# Altium PCB Oct_Ribbon_V2.1_PCB.PcbDoc
Units mm, origin at the board's own origin, x right, y up, seen from the top; angles counter-clockwise.
Board outline 193.21 x 103.78 mm, 2 copper layers (Top Layer, Bottom Layer), stack 0.09 mm thick; 9 components, 11 nets, 130 pads, 46 vias.
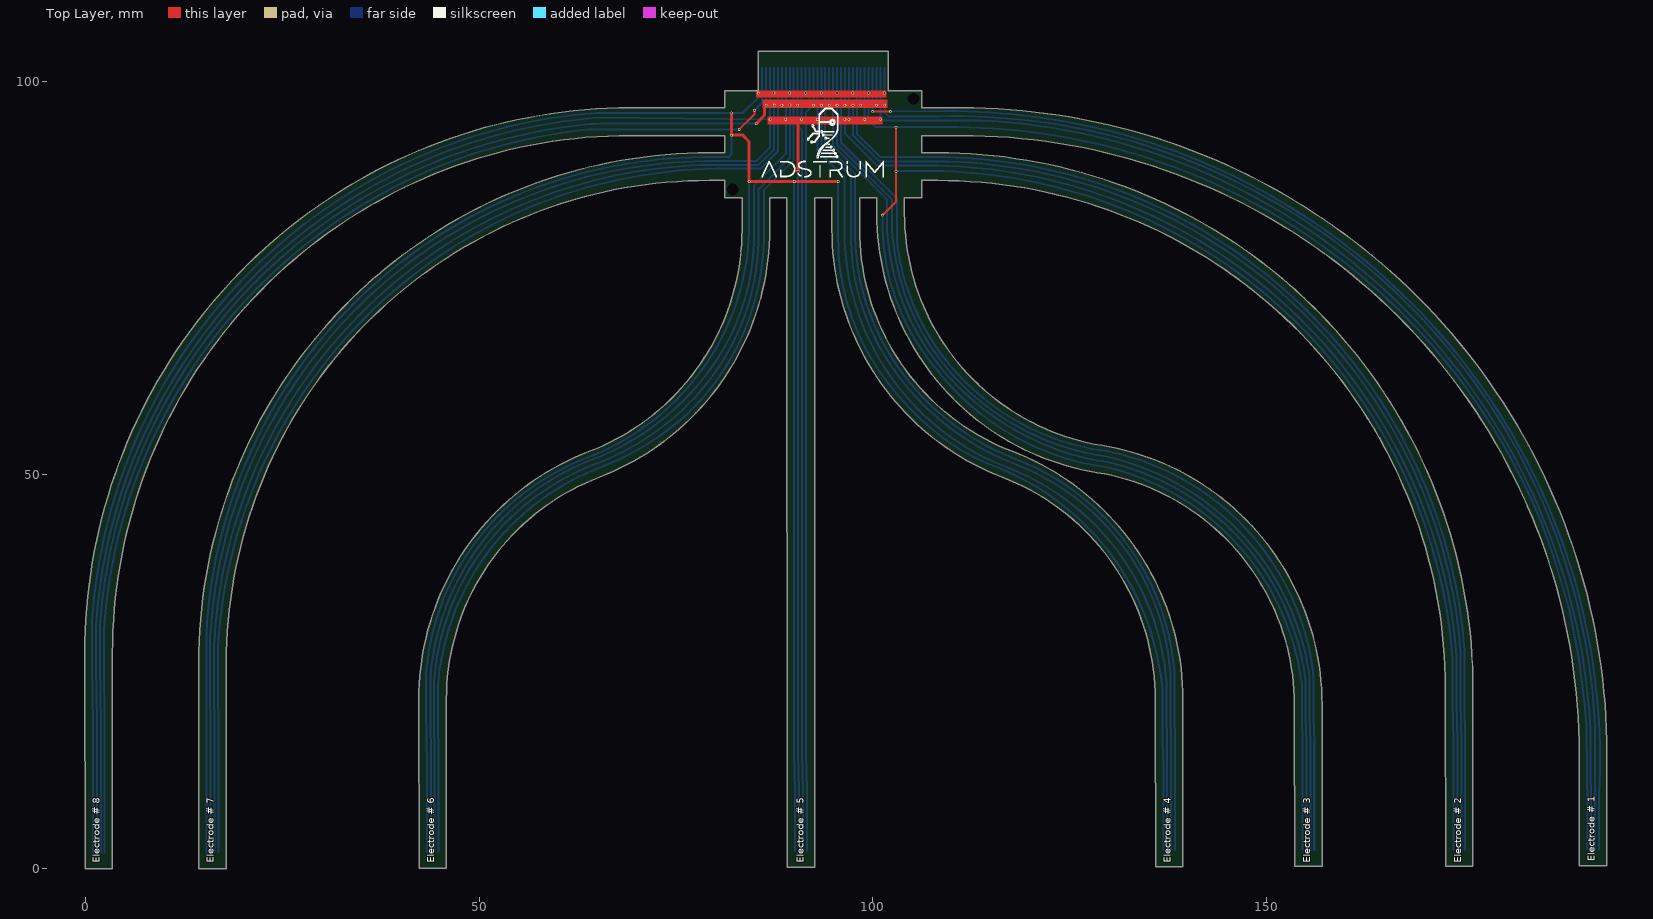
[diagram p0: Top Layer view]
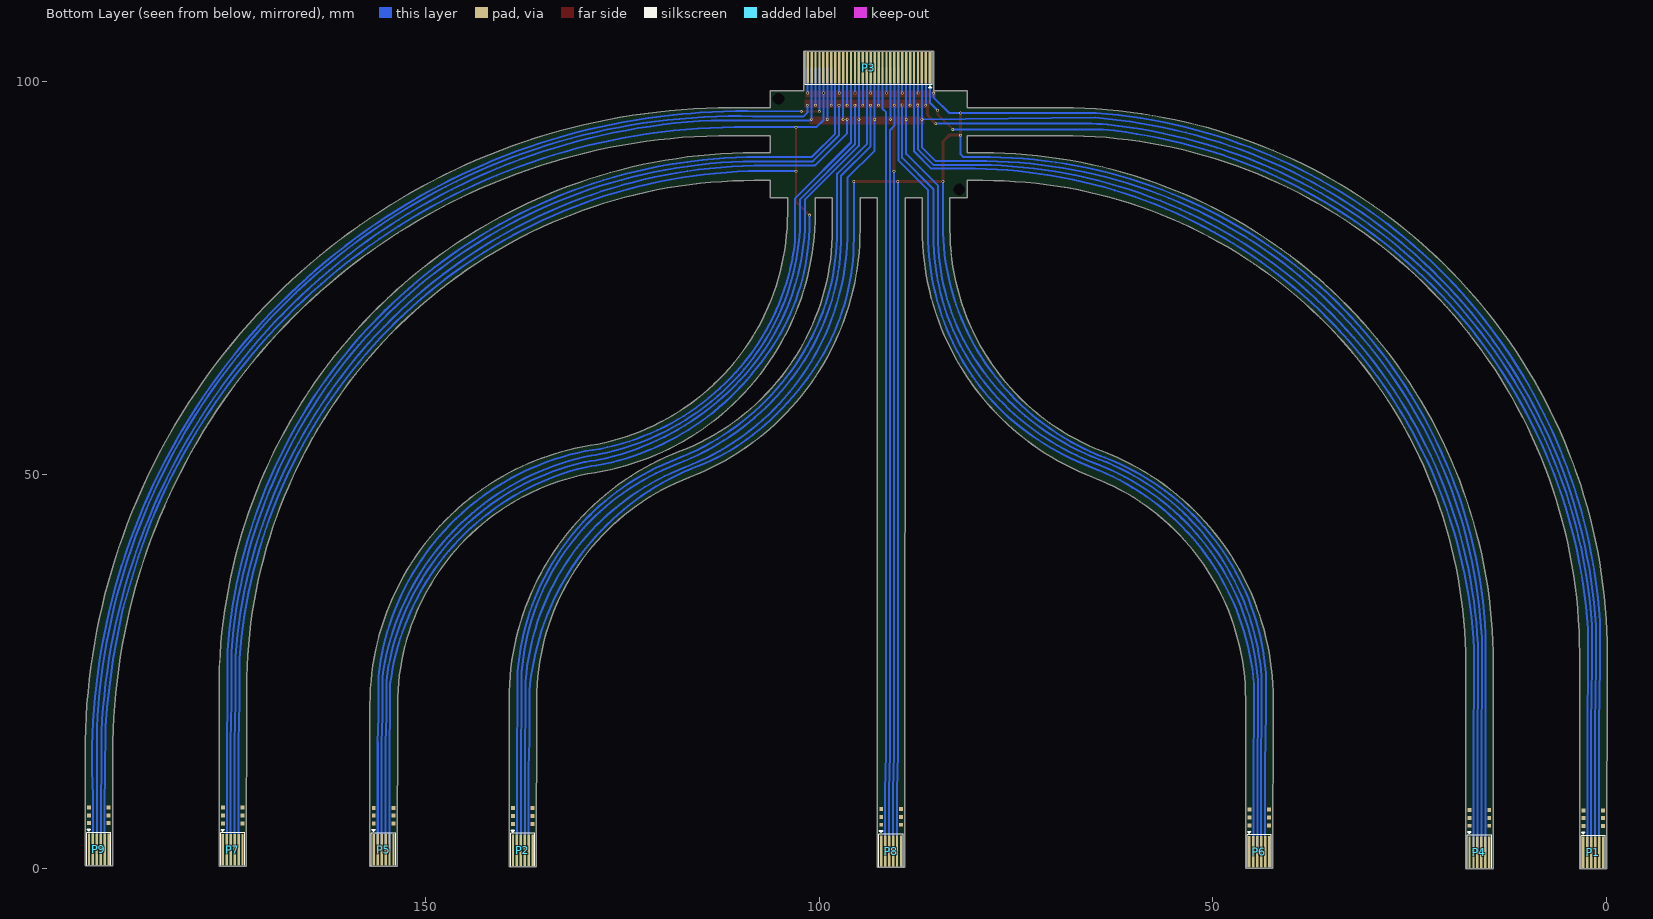
[diagram p1: Bottom Layer view, seen from below]

## Layer stack, top to bottom
Top Solder: solder mask 0.0127, Solder Resist, Dk 3.5
Top Layer: signal copper 0.035
Dielectric 1: dielectric 0.0203, FR-4, Dk 4.8
Bottom Layer: signal copper 0.035
Bottom Solder: solder mask 0.0127, Solder Resist, Dk 3.5

## Board outline
0,0 3.466,0.007 3.466,27.353 cw(c69.19,27.354) 69.191,93.078 81.184,93.078 81.184,90.891 79.191,90.891 ccw(c79.191,26.11) 14.409,26.11 14.448,0.029 17.922,0.036 17.922,26.109 cw(c79.19,26.11) 79.191,87.378 81.184,87.378 81.191,85.178 83.384,85.178 83.384,81.185 cw(c53.186,81.186) 63.992,52.987 ccw(c76.055,21.509) 42.344,21.508 42.382,0.085 45.857,0.092 45.857,21.508 cw(c76.056,21.507) 65.249,49.706 ccw(c53.187,81.184) 86.897,81.185 86.897,85.178 89.084,85.178 89.091,0.178 92.597,0.185 92.597,85.178 94.784,85.178 94.784,81.185 ccw(c128.495,81.184) 116.432,49.706 cw(c105.626,21.507) 135.824,21.508 135.861,0.271 139.337,0.278 139.337,21.508 ccw(c105.627,21.509) 117.689,52.987 cw(c128.496,81.186) 98.297,81.185 98.297,85.178 100.484,85.178 100.484,83.185 ccw(c133.813,83.184) 128.458,50.288 cw(c123.668,20.859) 153.484,20.858 153.52,0.307 156.997,0.313 156.997,20.858 ccw(c123.668,20.859) 129.023,53.755 cw(c133.816,83.186) 103.997,83.185 103.997,85.178 106.197,85.185 106.197,87.378 108.191,87.378 cw(c108.19,22.926) 172.642,22.926 172.682,0.345 176.156,0.352 176.156,22.926 ccw(c108.191,22.926) 108.191,90.891 106.197,90.891 106.197,93.078 111.191,93.078 cw(c111.19,14.619) 189.648,14.621 189.673,0.379 193.162,0.386 193.162,14.621 ccw(c111.192,14.621) 111.191,96.591 106.197,96.591 106.191,98.791 101.942,98.791 101.942,103.785 85.439,103.785 85.439,98.791 84.984,98.791 81.184,98.785 81.184,96.591 69.191,96.591 ccw(c69.191,27.352) -0.048,27.353

## Design rules (kind name [scope] priority, off if disabled: settings)
Clearance [All] p1: gap=0.178 ignorepadtopadclearanceinfootprint=FALSE except(0: Arc-Hole Track-Hole SMDPad-Hole THPad-Hole Via-Hole Fill-Hole Poly-Hole Region-Hole Text-Hole; 0.102: Arc-SMDPad Track-SMDPad SMDPad-SMDPad)
PolygonConnect [All] p1: connectstyle=Relief reliefconductorwidth=0.254 reliefentries=4 polygonreliefangle="90 Angle" airgapwidth=0.254
RoutingVias [All] p1: holewidth=0.3 width=0.6 viastyle="Through Hole" minholewidth=0.2 minwidth=0.35 maxholewidth=0.8 maxwidth=1.6
SilkToSilkClearance [All] p1: silktosilkclearance=0
SilkToSolderMaskClearance [IsPad] p1: minsilkscreentomaskgap=0 clearancetoexposedcopper=TRUE
SolderMaskExpansion [All] p1: expansion=0.102 istentingtop=FALSE
Width [All] p1: maxlimit=0.635 minlimit=0.254 preferedwidth=0.381 minimp=50.000000 maximp=50.000000 favimp=50.000000
28 further rules are at their usual default settings.

## Components (designator, comment, footprint, x,y, rotation, side; value= is the part's Value field where it differs from the comment)
P1 "6 pin Ribbon Pads" "6 pin Ribbon Pads." 1.733,2.095 r0 bottom locked
P2 "6 pin Ribbon Pads" "6 pin Ribbon Pads." 137.599,2.362 r0 bottom locked
P3 "32 pin Ribbon Pads" "32 pin Ribbon Pads." 93.691,101.676 r180 bottom locked
P4 "6 pin Ribbon Pads" "6 pin Ribbon Pads." 16.185,2.134 r0 bottom locked
P5 "6 pin Ribbon Pads" "6 pin Ribbon Pads." 155.26,2.413 r0 bottom locked
P6 "6 pin Ribbon Pads" "6 pin Ribbon Pads." 44.123,2.184 r0 bottom locked
P7 "6 pin Ribbon Pads" "6 pin Ribbon Pads." 174.419,2.438 r0 bottom locked
P8 "6 pin Ribbon Pads" "6 pin Ribbon Pads." 90.844,2.261 r0 bottom locked
P9 "6 pin Ribbon Pads" "6 pin Ribbon Pads." 191.418,2.464 r0 bottom locked

## Footprints (in the part's own frame and the unit in brackets; to place one, negate y for a bottom-side part, rotate by r counter-clockwise, add the part's x,y. Pads: shape width x height; smd on the part's side, far side on the other; paste and mask are expansions set on the pad)
"6 pin Ribbon Pads." [mm]
  rect 0.3x4 smd: 1(1.25,0) 2(0.75,0) 3(0.25,0) 4(-0.25,0) 5(-0.75,0) 6(-1.25,0)
  silkscreen extent -1.54,-2.54 1.54,2.01
"32 pin Ribbon Pads." [mm]
  rect 0.3x4 smd: 1(7.75,0) 2(7.25,0) 3(6.75,0) 4(6.25,0) 5(5.75,0) 6(5.25,0) 7(4.75,0) 8(4.25,0) 9(3.75,0) 10(3.25,0) 11(2.75,0) 12(2.25,0) 13(1.75,0) 14(1.25,0) 15(0.75,0) 16(0.25,0) 17(-0.25,0) 18(-0.75,0) 19(-1.25,0) 20(-1.75,0) 21(-2.25,0) 22(-2.75,0) 23(-3.25,0) 24(-3.75,0) 25(-4.25,0) 26(-4.75,0) 27(-5.25,0) 28(-5.75,0) 29(-6.25,0) 30(-6.75,0) 31(-7.25,0) 32(-7.75,0)
  silkscreen extent -8.04,-2.54 8.04,2.01

## Part data
P1 P2 P3 P4 P5 P6 P7 P8 P9: "Ribbon wire Connection Pads"

## Free pads (board coordinates)
  round 0 hole 1.5 unplated: MH1(105.156,97.739) MH2(82.194,86.233)
  rect 0.5x0.5 smd far side: ""(0.475,5.429) ""(0.475,6.429) ""(0.475,7.429) ""(2.99,5.429) ""(2.99,6.429) ""(2.99,7.429) ""(14.927,5.468) ""(14.927,6.468) ""(14.927,7.468) ""(17.442,5.468) ""(17.442,6.468) ""(17.442,7.468) ""(42.865,5.518) ""(42.865,6.518) ""(42.865,7.518) ""(45.379,5.518) ""(45.379,6.518) ""(45.379,7.518) ""(89.586,5.595) ""(89.586,6.595) ""(89.586,7.595) ""(92.101,5.595) ""(92.101,6.595) ""(92.101,7.595) ""(136.341,5.696) ""(136.341,6.696) ""(136.341,7.696) ""(138.856,5.696) ""(138.856,6.696) ""(138.856,7.696) ""(154.002,5.747) ""(154.002,6.747) ""(154.002,7.747) ""(156.517,5.747) ""(156.517,6.747) ""(156.517,7.747) ""(173.161,5.772) ""(173.161,6.772) ""(173.161,7.772) ""(175.676,5.772) ""(175.676,6.772) ""(175.676,7.772) ""(190.16,5.798) ""(190.16,6.798) ""(190.16,7.798) ""(192.675,5.798) ""(192.675,6.798) ""(192.675,7.798)

## Via types
v1: diameter 0.35, hole 0.2, Top Layer to Bottom Layer, 46 vias

## Nets (pads, with @x,y where several pads share a name; then routed paths per layer and width w, separated by ;. In a path a pad name is that pad's centre, name@x,y a point inside that pad or via, vN(x,y) a via of type N, cw(c..) or ccw(c..) an arc to the next point about the centre after c; other vN are vias at no path point)
GND: P1.5 P2.5 P3.4 P3.8 P3.12 P3.16 P3.20 P3.24 P3.28 P3.32 P4.5 P5.5 P6.5 P7.5 P8.5 P9.5 | length 1017
  Top Layer w0.254: v1@82.037,93.121 v1@82.042,93.127 ; v1@95.553,87.224 v1@95.579,87.224 ; v1@101.219,82.992 102.921,84.694 v1(102.921,88.56) v1(102.921,94.132)
  Top Layer w0.381: v1@82.037,93.121 83.472,93.121 84.272,92.321 v1(84.272,87.249) v1(89.992,87.249) v1(95.58,87.249) ; v1@82.042,93.127 v1@82.042,95.936
  Bottom Layer w0.254: P1.5 0.983,18.44 0.88,25.73 0.88,31.51 cw(c69.952,26.897) 64.873,95.936 v1(82.032,95.936) v1@82.033,95.936 ; 15.374,29.774 15.374,24.568 15.435,15.951 P4.5 ; 15.374,29.775 cw(c15.628,29.774) 15.374,29.788 cw(c79.148,26.495) 79.67,90.351 ; P6.5 43.373,13.183 43.292,19.939 43.292,24.863 cw(c75.14,22.348) 63.713,52.182 63.714,52.182 ccw(c52.128,82.41) 78.802,64.067 ccw(c53.172,81.692) 84.277,81.692 v1@84.277,87.249 ; 79.671,90.351 81.685,90.351 82.032,90.698 v1(82.032,93.116) ; v1@82.042,95.936 83.49,95.936 85.448,97.894 v1@85.448,98.514 ; v1(87.429,98.476) 87.435,98.482 P3.4@87.435,101.67 ; v1(89.435,98.482) 89.441,98.487 P3.8 ; v1@89.985,87.242 89.985,14.633 90.094,9.895 P8.5 ; v1(89.992,87.249) v1@90.053,87.249 ; v1@91.441,98.487 P3.12 ; v1(93.429,98.476) 93.435,98.482 P3.16@93.435,101.67 ; v1(95.435,98.482) 95.441,98.487 P3.20 ; v1@95.58,87.224 95.58,80.01 ccw(c125.271,80.008) 100.807,63.184 ccw(c131.301,84.154) 108.39,55.09 ccw(c124.937,76.08) 115.365,51.125 ; v1(97.429,98.476) 97.435,98.482 P3.24@97.435,101.67 ; v1@99.418,98.476 99.435,98.459 99.435,95.035 100.338,94.132 v1(102.921,94.132) 109.167,94.132 cw(c110.102,13.395) 184.702,44.285 186.408,39.606 ; v1(99.435,98.482) 99.441,98.487 P3.28 ; v1(101.219,82.982) 101.213,82.976 ccw(c130.04,82.088) 107.949,63.546 107.95,63.545 cw(c107.754,63.383) 107.954,63.54 ccw(c134.211,83.824) 128.269,51.181 ccw(c128.315,51.431) 128.285,51.179 cw(c126.561,35.687) 130.586,50.746 cw(c122.2,19.36) 154.428,23.453 154.428,19.304 154.51,16.042 P5.5 ; v1@101.441,98.487 P3.32 ; v1(102.921,88.56) 108.929,88.56 cw(c108.929,88.306) 108.936,88.56 cw(c106.778,21.599) 173.583,26.644 cw(c173.33,26.626) 173.584,26.626 173.584,21.133 173.669,16.068 P7.5 ; 115.366,51.124 cw(c103.408,19.892) 136.749,22.502 cw(c136.496,22.483) 136.75,22.483 136.75,16.309 136.849,12.743 P2.5 ; 186.413,39.591 188.312,33.158 ; 188.318,33.136 189.634,26.654 ; 189.638,26.635 190.398,20.479 ; 190.399,20.466 190.576,18.068 ; 190.576,18.051 190.602,11.938 190.668,8.298 P9.5
  other v1: 85.439,98.47 91.435,98.482 101.435,98.482
Measure1: P1.2 P3.1 | length 152.5
  Top Layer w0.254: v1(83.03,93.853) 84.963,95.786 v1(84.963,96.291)
  Bottom Layer w0.254: 2.382,30.465 2.382,25.781 2.483,18.44 P1.2 ; 2.382,30.466 cw(c2.636,30.465) 2.382,30.482 cw(c70.659,25.742) 63.935,93.852 cw(c63.959,93.599) 63.959,93.853 v1(83.03,93.853) ; v1(84.963,96.291) 85.943,97.272 P3.1@85.943,101.674
Measure2: P3.5 P4.2 | length 141.8
  Bottom Layer w0.254: P4.2 16.935,15.951 16.868,24.562 16.868,27.838 cw(c17.122,27.837) 16.868,27.849 cw(c81.056,24.607) 81.582,88.875 85.753,88.875 87.941,91.062 P3.5
Measure3: P3.9 P6.2 | length 118.7
  Bottom Layer w0.254: P6.2 44.873,13.183 44.792,19.939 44.792,23.406 cw(c76.905,20.87) 65.381,50.951 ccw(c52.825,83.707) 74.542,56.157 ccw(c56.379,79.2) 80.555,62.575 ccw(c54.333,80.607) 86.157,80.608 86.157,86.159 89.941,89.943 P3.9
Measure4: P3.13 P8.2 | length 99.6
  Bottom Layer w0.254: P8.2 91.594,9.895 91.494,14.633 91.494,85.344 91.494,96.016 91.941,96.462 P3.13
Measure5: P2.2 P3.17 | length 118.1
  Bottom Layer w0.254: P3.17 93.941,92 97.709,88.232 97.709,80.974 ccw(c127.747,80.974) 102.991,63.96 ccw(c129.918,82.465) 109.686,56.81 ccw(c129.763,82.268) 118.107,52.014 cw(c106.835,22.593) 138.243,25.081 138.243,19.964 138.349,15.991 P2.2
Measure6: P3.21 P5.2 | length 129.1
  Bottom Layer w0.254: P3.21 95.941,92.197 103.022,85.115 103.022,79.844 ccw(c132.627,83.019) 109.933,63.745 ccw(c133.702,83.933) 129.66,53.011 cw(c129.626,52.759) 129.674,53.008 cw(c123.282,20.79) 155.927,24.418 cw(c155.674,24.391) 155.928,24.391 155.928,19.304 156.01,16.042 P5.2
Measure7: P3.25 P7.2 | length 145.8
  Bottom Layer w0.254: P3.25 97.941,93.331 100.825,90.448 100.899,90.373 107.696,90.373 cw(c107.515,22.613) 175.087,27.666 cw(c174.834,27.648) 175.088,27.648 175.088,21.361 175.169,16.068 P7.2
Measure8: P3.29 P9.2 | length 156.2
  Top Layer w0.254: v1(99.939,96.114) v1(102.235,96.114)
  Bottom Layer w0.254: v1@99.941,96.116 P3.29 ; v1(102.235,96.114) 109.102,96.182 cw(c109.105,6.023) 115.117,95.981 cw(c109.105,6.023) 118.544,95.686 cw(c109.922,13.771) 192.168,9.301 ccw(c192.422,9.288) 192.168,9.288 192.168,4.337 P9.2
VCC_3V3: P1.4 P2.4 P3.3 P3.7 P3.11 P3.15 P3.19 P3.23 P3.27 P3.31 P4.4 P5.4 P6.4 P7.4 P8.4 P9.4 | length 1063.1
  Top Layer w0.381: v1(90.482,88.544) 90.482,94.978
  Bottom Layer w0.254: P1.4 1.483,18.44 1.381,25.781 1.381,30.897 cw(c70.402,26.377) 60.547,94.841 cw(c70.402,26.377) 60.55,94.841 60.552,94.841 cw(c60.583,94.589) 60.554,94.842 64.897,95.35 cw(c64.926,95.097) 64.93,95.351 v1(86.941,95.123) ; P4.4 15.935,15.951 15.867,24.562 15.867,29.301 cw(c16.121,29.3) 15.867,29.312 cw(c79.598,26.023) 80.118,89.836 cw(c80.12,89.582) 80.12,89.836 85.185,89.836 86.937,91.588 86.937,95.085 v1@86.949,95.098 ; 43.823,24.398 cw(c76.003,21.839) 64.458,51.985 ccw(c52.646,82.788) 79.827,64.092 ccw(c56.153,80.377) 84.887,80.378 84.887,86.711 88.941,90.764 v1(88.941,95.123) P3.7 ; 43.824,24.384 43.824,19.939 43.873,13.183 P6.4 ; P3.3 86.941,95.137 v1@86.954,95.123 ; v1@90.485,88.542 90.485,14.633 90.594,9.895 P8.4 ; v1@90.939,95.125 P3.11@90.939,101.674 ; P3.15 92.941,91.151 96.393,87.699 96.393,80.943 ccw(c128.485,80.942) 116.943,50.997 cw(c105.593,21.341) 137.249,23.827 cw(c136.996,23.808) 137.25,23.808 137.25,19.558 137.349,15.991 P2.4 ; P3.19 v1(94.941,95.123) 94.941,91.772 101.803,84.91 101.803,81.164 ccw(c131.826,82.736) 109.379,62.738 ; v1(96.444,95.123) 96.444,93.383 100.497,89.33 100.571,89.256 108.204,89.256 cw(c106.84,21.832) 174.083,26.948 cw(c173.83,26.93) 174.084,26.93 174.084,21.133 174.169,16.068 P7.4 ; v1(96.941,95.123) P3.23 ; v1(98.941,95.123) P3.27 ; v1(100.941,95.123) ccw(c101.232,95.414) 101.232,95.002 113.631,95.002 cw(c109.682,13.62) 191.073,17.37 191.073,17.364 191.073,13.056 191.168,8.298 P9.4 ; v1@100.941,95.147 P3.31 ; 109.379,62.738 ccw(c135.035,85.432) 127.161,52.096 ccw(c132.325,73.953) 129.647,51.654 cw(c129.619,51.402) 129.662,51.652 cw(c128.603,45.63) 130.014,51.58 cw(c122.465,19.736) 154.926,23.89 cw(c154.674,23.859) 154.928,23.859 154.928,19.304 155.01,16.042 P5.4
  other v1: 90.937,95.123 92.941,95.123
VREF: P1.3 P2.3 P3.2 P3.6 P3.10 P3.14 P3.18 P3.22 P3.26 P3.30 P4.3 P5.3 P6.3 P7.3 P8.3 P9.3 | length 1061.5
  Top Layer w0.381: v1(85.169,94.59) 86.235,95.656 86.235,96.723
  Bottom Layer w0.254: P1.3 1.983,18.44 1.882,25.781 1.882,30.971 1.882,30.98 cw(c70.35,26.17) 63.38,94.452 cw(c66.09,67.929) 66.092,94.59 v1@85.194,94.59 ; P4.3 16.435,15.951 16.368,24.562 16.368,28.475 cw(c16.622,28.474) 16.368,28.485 cw(c80.427,25.217) 80.952,89.357 cw(c80.954,89.103) 80.954,89.357 85.476,89.357 87.45,91.331 v1@87.45,96.98 ; P6.3 44.373,13.183 44.292,19.939 44.292,24.018 cw(c76.196,21.489) 64.749,51.377 ccw(c52.413,83.55) 73.743,56.489 ccw(c54.23,81.245) 80.202,63.382 ccw(c55.545,80.341) 85.471,80.341 85.471,86.264 89.456,90.249 v1@89.456,96.977 ; v1(86.441,96.929) P3.2 ; v1(88.441,96.929) P3.6 ; v1@90.424,96.962 90.424,94.336 90.994,93.765 90.994,85.344 90.994,14.633 91.094,9.895 P8.3 ; v1(90.441,96.929) P3.10 ; v1(92.441,96.929) P3.14 ; v1(93.46,96.929) 93.46,91.736 97.19,88.006 97.19,80.451 ccw(c126.641,80.451) 102.374,63.764 ccw(c129.96,82.526) 118.009,51.378 ; v1(94.441,96.929) P3.18 ; v1@95.43,96.943 95.43,91.956 102.438,84.948 102.438,81.164 ccw(c132.219,82.724) 109.492,63.415 ccw(c134.086,84.309) 127.802,52.656 ccw(c131.627,71.899) 128.865,52.475 cw(c128.828,52.224) 128.877,52.473 cw(c122.381,19.746) 155.428,24.339 155.428,19.304 155.51,16.042 P5.3 ; v1(96.441,96.929) P3.22 ; v1@97.467,96.901 97.467,93.129 100.708,89.889 100.782,89.814 108.179,89.814 cw(c107.433,22.474) 174.584,27.574 cw(c174.331,27.556) 174.585,27.556 174.585,21.133 174.669,16.068 P7.3 ; v1(98.441,96.929) P3.26 ; v1(100.441,96.929) P3.30 ; v1(101.49,96.929) 101.49,95.995 101.959,95.526 108.37,95.526 cw(c110.24,14.031) 191.668,17.836 P9.3 ; 118.01,51.378 cw(c106.974,22.546) 137.749,24.981 cw(c137.496,24.962) 137.75,24.962 137.75,19.558 137.849,15.991 P2.3
  other v1: 95.441,96.924 97.461,96.912 87.458,96.941 89.459,96.954
pads on no net: P1.1 P1.6 P2.1 P2.6 P4.1 P4.6 P5.1 P5.6 P6.1 P6.6 P7.1 P7.6 P8.1 P8.6 P9.1 P9.6

## Other copper
Top Layer:
  rectangle net VREF: 86.004,96.593 101.856,97.663
  rectangle net GND: 85.181,97.917 101.722,98.806
  rectangle net VCC_3V3: 86.608,94.488 101.239,95.476

## Silkscreen, mask and mechanical layers (free items; w line width, h text height)
Top Overlay:
  drawing of 2568 lines, arcs and shapes, not listed
  text "Electrode # 1" at 191.956,0.941 h1.52 r90
  text "Electrode # 8" at 2.191,0.779 h1.52 r90
  text "Electrode # 7" at 16.671,0.779 h1.52 r90
  text "Electrode # 3" at 155.811,0.778 h1.52 r90
  text "Electrode # 2" at 174.964,0.787 h1.52 r90
  text "Electrode # 6" at 44.609,0.766 h1.52 r90
  text "Electrode # 5" at 91.523,0.759 h1.52 r90
  text "Electrode # 4" at 138.083,0.749 h1.52 r90
Mechanical 1:
  text "Stiffener Area" at 56.261,99.619 h1.52
  text "Stiffener Area" at 9.144,6.375 h1.52 r90
  text "Stiffener Area" at 182.575,4.013 h1.52 r90
  text "Stiffener Area" at 144.805,3.81 h1.52 r90
  text "Stiffener Area" at 162.611,3.302 h1.52 r90
  text "Stiffener Area" at 22.047,3.124 h1.52
  text "Stiffener Area" at 197.104,2.261 h1.52
  text "Stiffener Area" at 97.79,1.753 h1.52
  text "Stiffener Area" at 52.527,0.432 h1.52
Mechanical 2:
  lines w0.013: -0.048,27.353 cw(c69.191,27.352) 69.191,96.591 81.184,96.591 81.184,98.785 84.984,98.791 85.439,98.791 85.439,103.785 101.942,103.785 101.942,98.791 102.397,98.791 106.191,98.791 106.197,96.591 111.191,96.591 cw(c111.192,14.621) 193.162,14.621 193.162,0.386 189.673,0.379 189.648,14.621 ccw(c111.19,14.619) 111.191,93.078 106.197,93.078 106.197,90.891 108.191,90.891 cw(c108.191,22.926) 176.156,22.926 176.156,0.352 172.682,0.345 172.642,22.926 ccw(c108.19,22.926) 108.191,87.378 106.197,87.378 106.197,85.185 103.997,85.178 103.997,83.185 ccw(c133.816,83.186) 129.023,53.755 cw(c123.668,20.859) 156.997,20.858 156.997,0.313 153.52,0.307 153.484,20.858 ccw(c123.668,20.859) 128.458,50.288 cw(c133.813,83.184) 100.484,83.185 100.484,85.178 98.297,85.178 98.297,81.185 ccw(c128.496,81.186) 117.689,52.987 cw(c105.627,21.509) 139.337,21.508 139.337,0.278 135.861,0.271 135.824,21.508 ccw(c105.626,21.507) 116.432,49.706 cw(c128.495,81.184) 94.784,81.185 94.784,85.178 92.597,85.178 92.597,0.185 89.091,0.178 89.084,85.178 86.897,85.178 86.897,81.185 cw(c53.187,81.184) 65.249,49.706 ccw(c76.056,21.507) 45.857,21.508 45.857,0.092 42.382,0.085 42.344,21.508 cw(c76.055,21.509) 63.992,52.987 ccw(c53.186,81.186) 83.384,81.185 83.384,85.178 81.191,85.178 81.184,87.378 79.191,87.378 ccw(c79.19,26.11) 17.922,26.109 17.922,0.036 14.448,0.029 14.409,26.11 cw(c79.191,26.11) 79.191,90.891 81.184,90.891 81.184,93.078 69.191,93.078 ccw(c69.19,27.354) 3.466,27.353 3.466,0.007 0,0 -0.048,27.353
Drill Drawing:
  drawing of 1310 lines, arcs and shapes, not listed
  text "Symbol" at 221.933,126.606 h1.83
  text "Count" at 234.782,126.606 h1.83
  text "Hole Size" at 248.494,126.606 h1.83
  text "Plated" at 276.172,126.606 h1.83
  text "Hole Type" at 289.021,126.606 h1.83
  text "Drill Layer Pair" at 307.66,126.606 h1.83
  text "Via/Pad" at 345.749,126.606 h1.83
  text "Pad Shape" at 360.731,126.606 h1.83
  text "Template" at 379.674,126.606 h1.83
  text "Description" at 396.18,126.606 h1.83
  text "Hole Tolerance (+)" at 417.865,126.606 h1.83
  text "Hole Tolerance (-)" at 451.739,126.606 h1.83
  text "2" at 234.782,122.796 h1.52
  text "59.06mil (1.500mm)" at 248.494,122.796 h1.52
  text "NPTH" at 276.172,122.796 h1.52
  text "Round" at 289.021,122.796 h1.52
  text "Top Layer - Bottom Layer" at 307.66,122.796 h1.52
  text "Pad" at 345.749,122.796 h1.52
  text "Rounded" at 360.731,122.796 h1.52
  text "c0hn150" at 379.674,122.796 h1.52
  text "46" at 234.782,118.986 h1.52
  text "7.87mil (0.200mm)" at 248.494,118.986 h1.52
  text "PTH" at 276.172,118.986 h1.52
  text "Round" at 289.021,118.986 h1.52
  text "Top Layer - Bottom Layer" at 307.66,118.986 h1.52
  text "Via" at 345.749,118.986 h1.52
  text "Rounded" at 360.731,118.986 h1.52
  text "(Mixed)" at 379.674,118.986 h1.52
  text "48 Total" at 234.782,115.176 h1.52
  text "Layer" at 299.098,96.56 h1.52
  text "Name" at 309.509,96.56 h1.52
  text "Material" at 333.125,96.56 h1.52
  text "Thickness" at 354.963,96.56 h1.52
  text "Constant" at 371.469,96.56 h1.52
  text "Board Layer Stack" at 385.943,96.56 h1.52
  text "Top Overlay" at 309.509,93.512 h1.52
  text "Top Solder" at 309.509,90.464 h1.52
  text "Solder Resist" at 333.125,90.464 h1.52
  text "0.50mil" at 354.963,90.464 h1.52
  text "3.5" at 371.469,90.464 h1.52
  text "1" at 299.098,87.416 h1.52
  text "Top Layer" at 309.509,87.416 h1.52
  text "1.38mil" at 354.963,87.416 h1.52
  text "Dielectric 1" at 309.509,84.368 h1.52
  text "FR-4" at 333.125,84.368 h1.52
  text "0.80mil" at 354.963,84.368 h1.52
  text "4.8" at 371.469,84.368 h1.52
  text "2" at 299.098,81.32 h1.52
  text "Bottom Layer" at 309.509,81.32 h1.52
  text "1.38mil" at 354.963,81.32 h1.52
  text "Bottom Solder" at 309.509,78.272 h1.52
  text "Solder Resist" at 333.125,78.272 h1.52
  text "0.50mil" at 354.963,78.272 h1.52
  text "3.5" at 371.469,78.272 h1.52
  text "Bottom Overlay" at 309.509,75.224 h1.52

## Dimensions
192.962,4.597 to 192.962,0.457 on Mechanical 1
175.963,4.572 to 175.963,0.432 on Mechanical 1
156.804,4.547 to 156.804,0.406 on Mechanical 1
139.143,4.496 to 139.143,0.356 on Mechanical 1
3.277,4.229 to 3.277,0.089 on Mechanical 1
92.388,4.394 to 92.388,0.254 on Mechanical 1
45.667,4.318 to 45.667,0.178 on Mechanical 1
17.729,4.267 to 17.729,0.127 on Mechanical 1
85.647,103.683 to 85.647,99.543 on Mechanical 1
85.941,101.676 to 101.441,101.676 on Mechanical 1
85.439,103.785 to 101.942,103.785 on Mechanical 1